# Altium PCB GR_carte_PiHat27.PcbDoc
Units mil, origin at the board's own origin, x right, y up, seen from the top; angles counter-clockwise.
Board outline 1945 x 2315 mil, 2 copper layers (Top Layer, Bottom Layer); 13 components, 19 nets, 92 pads, 0 vias.
Unrouted connection lines stored in the file: 2.
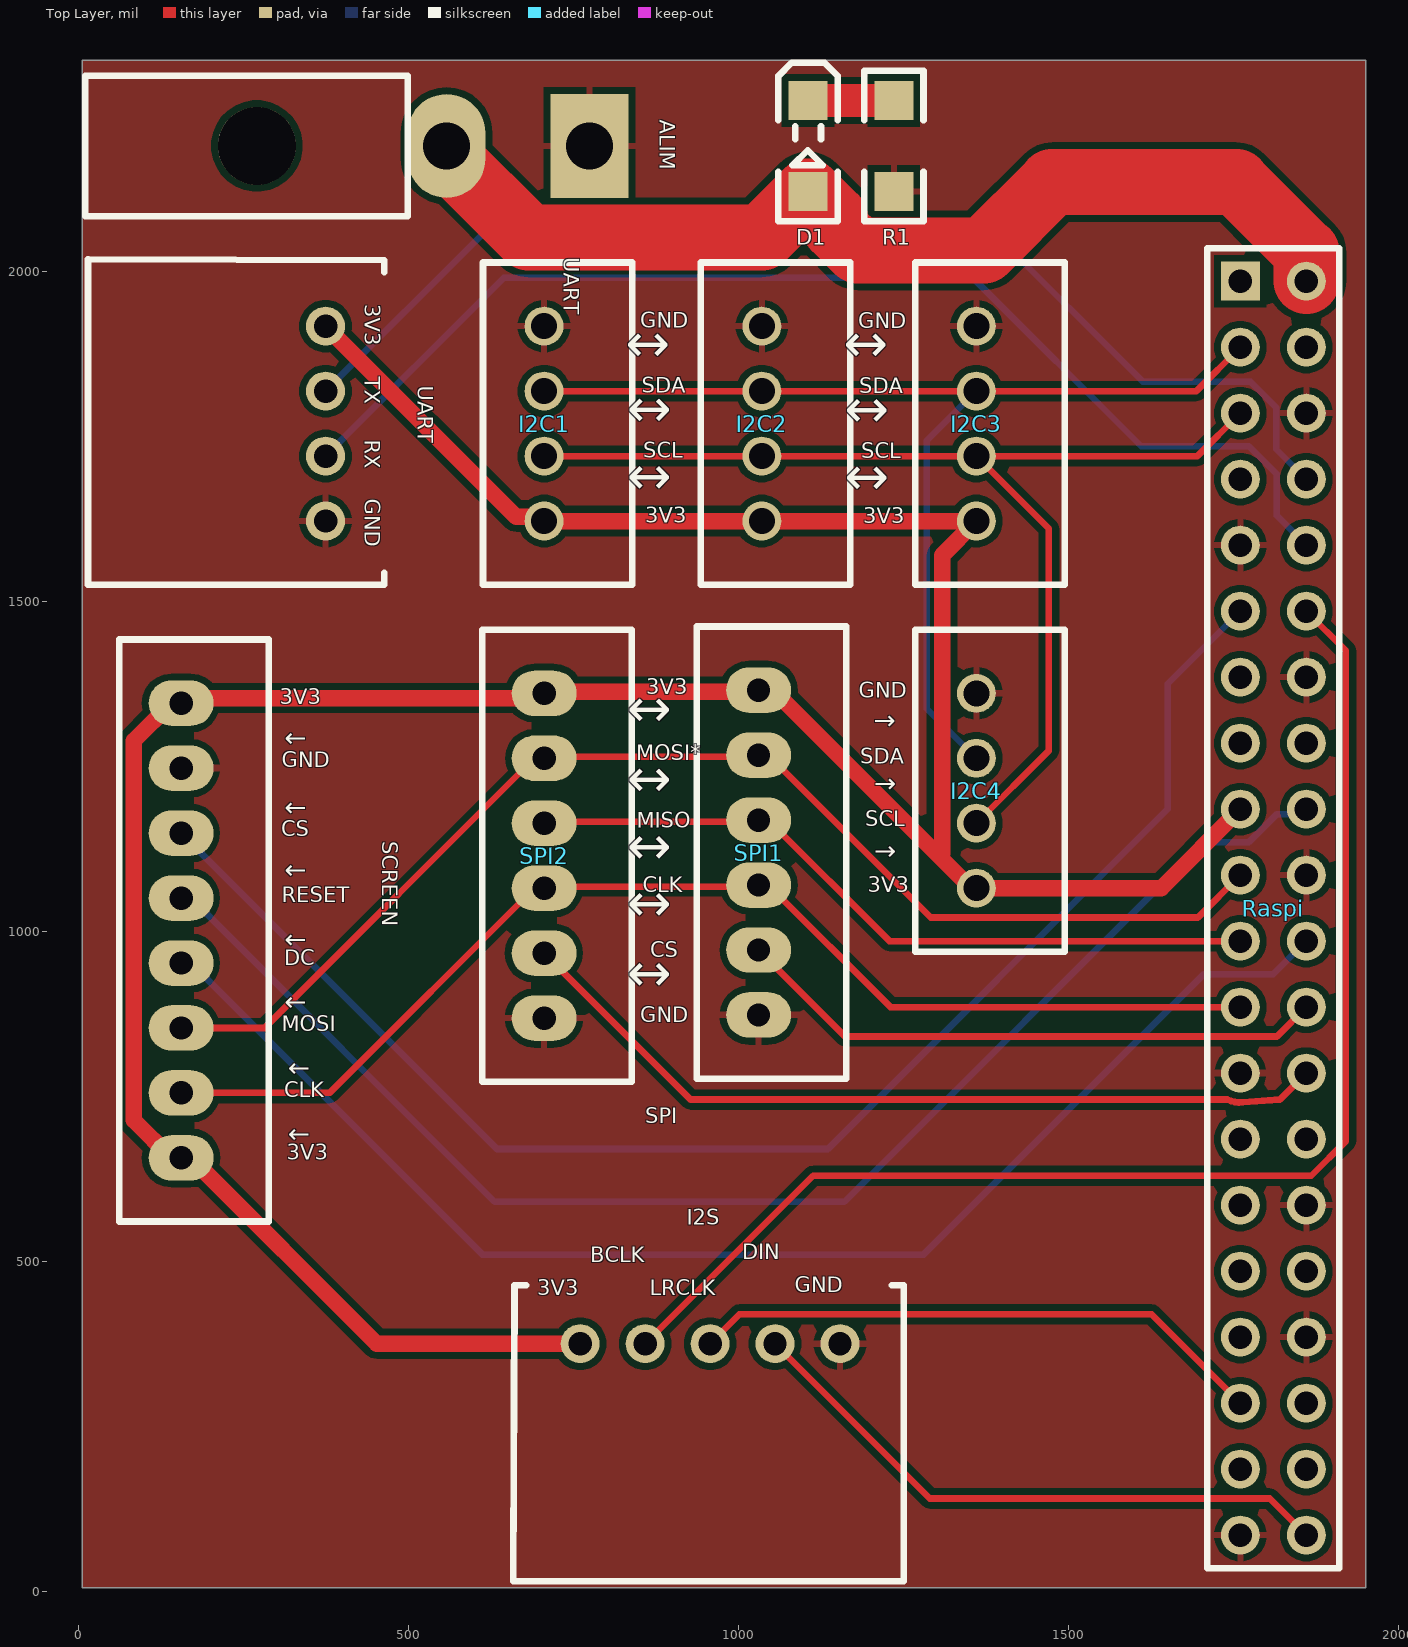
[diagram p0: Top Layer view]
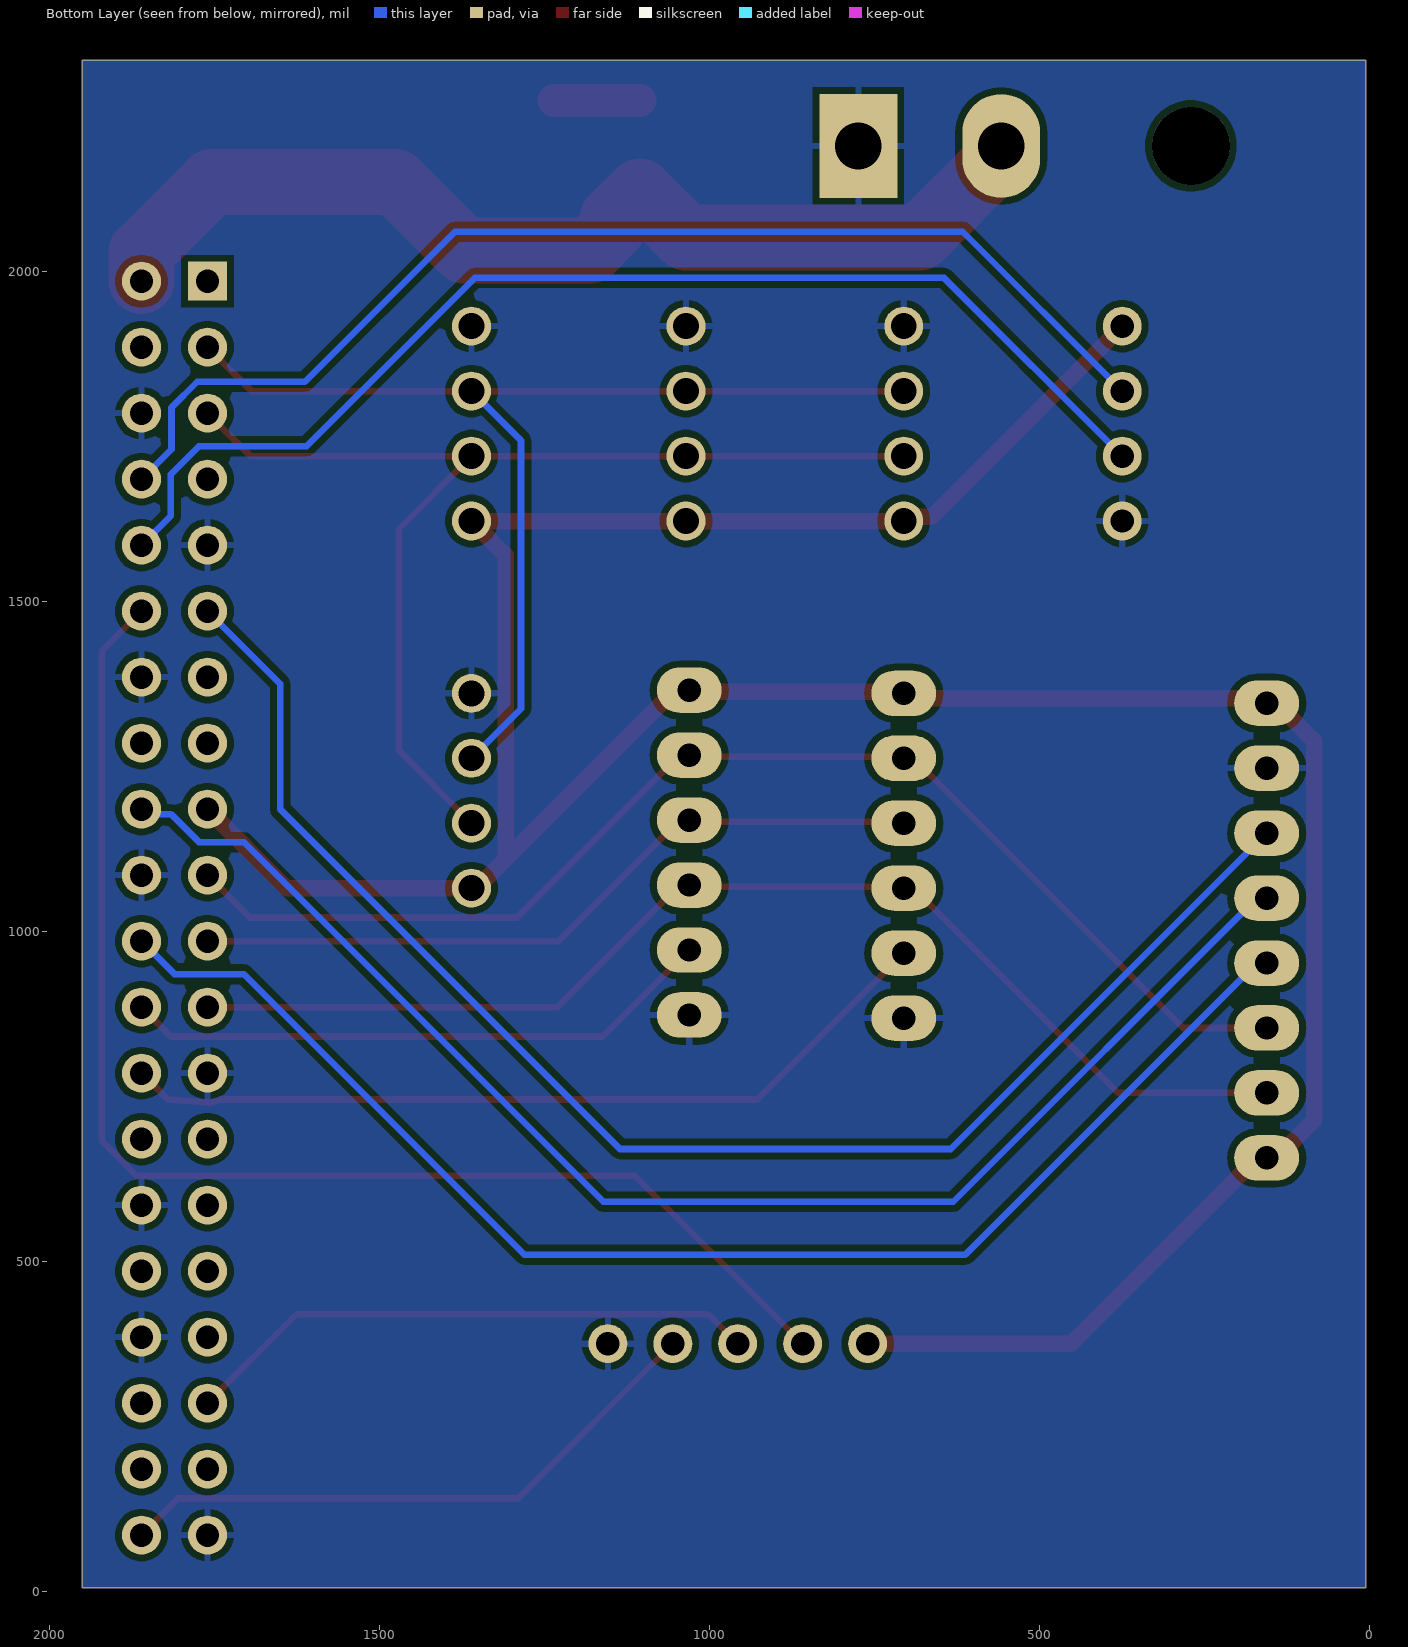
[diagram p1: Bottom Layer view, seen from below]
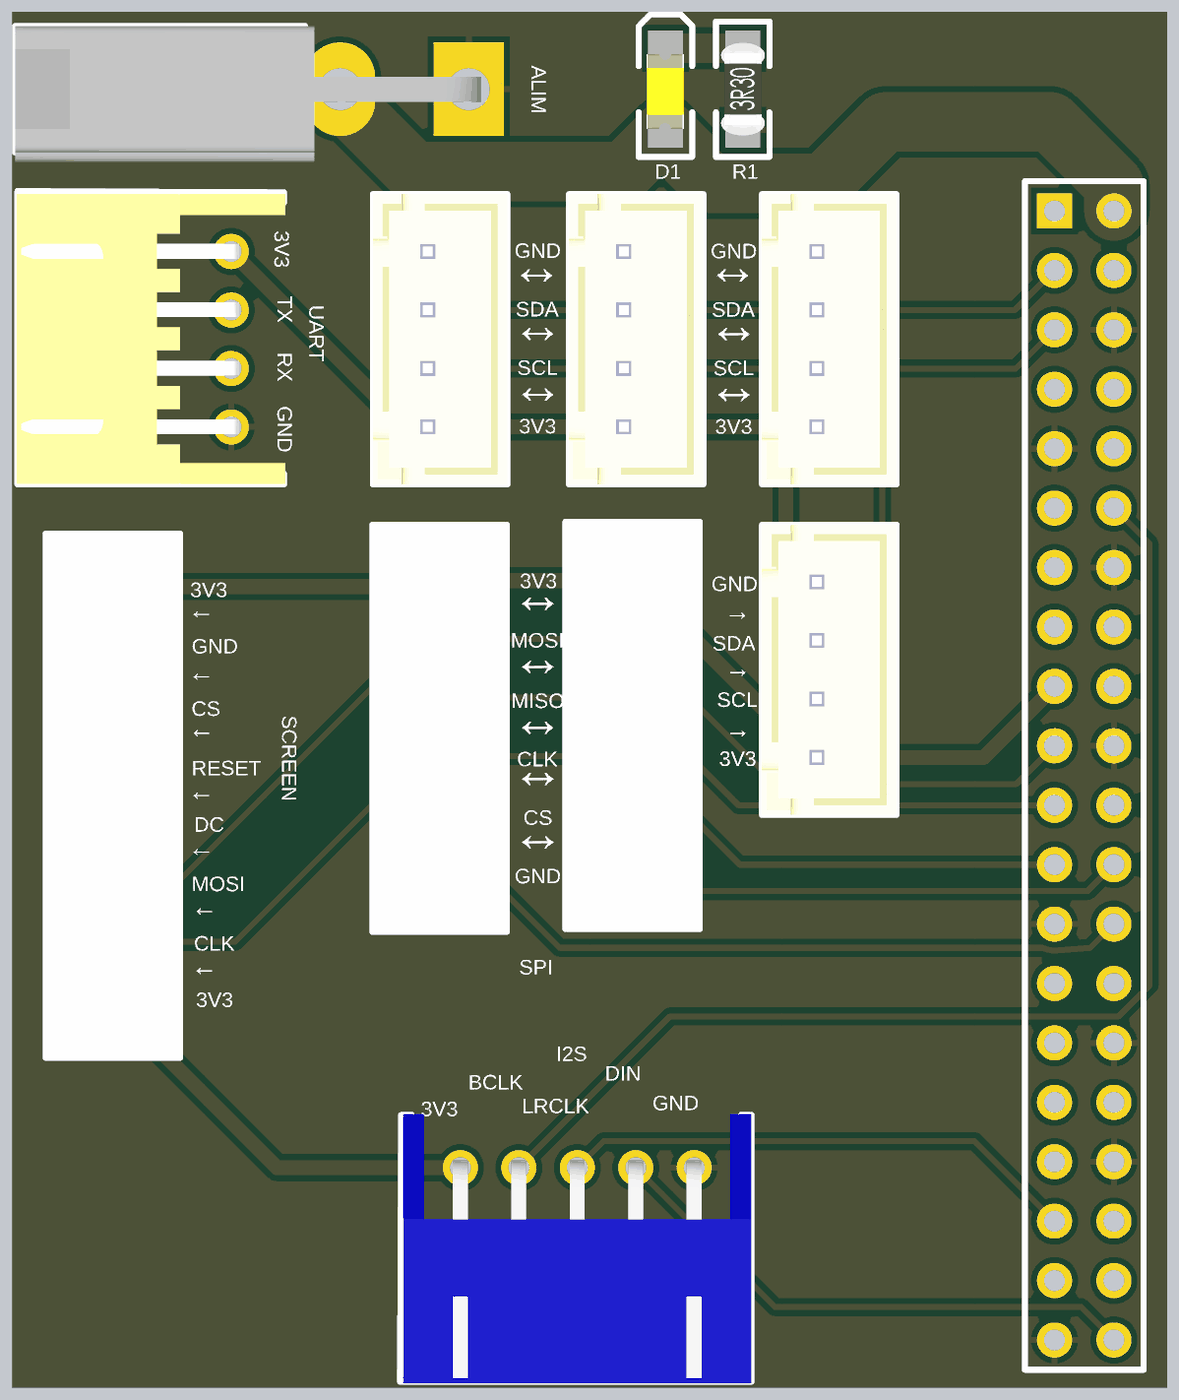
[diagram p2: 3D render of the assembled board from above, using the file's embedded part models]

## Layer stack, top to bottom
Top Solder: solder mask 0.4, Solder Resist, Dk 3.5
Top Layer: signal copper 1.4
Dielectric 1: dielectric 12.6, FR-4, Dk 4.8
Bottom Layer: signal copper 1.4
Bottom Solder: solder mask 0.4, Solder Resist, Dk 3.5

## Board outline
5,5 1950,5 1950,2320 5,2320

## Design rules (kind name [scope] priority, off if disabled: settings)
Clearance [All] p1: gap=10 ignorepadtopadclearanceinfootprint=FALSE
PolygonConnect [All] p1: connectstyle=Relief reliefconductorwidth=10 reliefentries=4 polygonreliefangle="90 Angle" airgapwidth=10
RoutingVias [All] p1: holewidth=28 width=50 viastyle="Through Hole" minholewidth=28 minwidth=50 maxholewidth=28 maxwidth=50
SolderMaskExpansion [All] p1: expansion=0 istentingtop=FALSE
SupplyNets "Schematic Supply Nets" [InNet('GND')] p1: voltage=0.000
SupplyNets "Schematic Supply Nets_2" [InNet('3V3_L')] p2: voltage=0.000
SupplyNets "Schematic Supply Nets_1" [InNet('5V_Pi')] p3: voltage=0.000
Width [All] p1: maxlimit=100 minlimit=10 preferedwidth=10 minimp=50.000000 maximp=50.000000 favimp=50.000000
30 further rules are at their usual default settings.

## Components (designator, comment, footprint, x,y, rotation, side; value= is the part's Value field where it differs from the comment)
ALIM "Header 2H" Molex_MiniFitJr_2x1H 557.24,2190 r180 top
D1 "5V_L" KP-3216SEC 1105,2190 r90 top
I2C1 "Header 4V" B4BXHALFSN 705,1916.85 r270 top
I2C2 "Header 4V" B4BXHALFSN 1035,1916.85 r270 top
I2C3 "Header 4V" B4BXHALFSN 1360,1916.85 r270 top
I2C4 "Header 4V" B4BXHALFSN 1360,1360.55 r270 top
I2S "Header 5H" S5B-XH-A 1153.43,375 r180 top
R1 "Res2" "Resistor 1206" 1235,2190 r90 top value=300
Raspi "Header 20X2" HDR2X20 1760,1985 r270 top
SCREEN "Header 8" "JST XH B8B-XH-A" 155,1001.06 r90 top
SPI1 "Header 6" "JST XH B6B-XH-A" 1030,1119.21 r90 top
SPI2 "Header 6" "JST XH B6B-XH-A" 705,1114.49 r90 top
UART "Header 4H" S4B-XH-A 373.9,1621.57 r90 top

## Footprints (in the part's own frame and the unit in brackets; to place one, negate y for a bottom-side part, rotate by r counter-clockwise, add the part's x,y. Pads: shape width x height; smd on the part's side, far side on the other; paste and mask are expansions set on the pad)
B4BXHALFSN [mm]
  round 1.5 hole 1: 1(0,0) 2(2.5,0) 3(5,0) 4(7.5,0)
  silkscreen extent -2.45,-2.35 9.95,3.4, body extent -2.45,-2.35 9.95,3.4, height 7.52
HDR2X20 [mm] "Connector; Header; 20x2 Position"
  rect 1.5x1.5 hole 0.9: 1(0,0)
  round 1.5 hole 0.9: 2(0,2.54) 3(2.54,0) 4(2.54,2.54) 5(5.08,0) 6(5.08,2.54) 7(7.62,0) 8(7.62,2.54) 9(10.16,0) 10(10.16,2.54) 11(12.7,0) 12(12.7,2.54) 13(15.24,0) 14(15.24,2.54) 15(17.78,0) 16(17.78,2.54) 17(20.32,0) 18(20.32,2.54) 19(22.86,0) 20(22.86,2.54) 21(25.4,0) 22(25.4,2.54) 23(27.94,0) 24(27.94,2.54) 25(30.48,0) 26(30.48,2.54) 27(33.02,0) 28(33.02,2.54) 29(35.56,0) 30(35.56,2.54) 31(38.1,0) 32(38.1,2.54) 33(40.64,0) 34(40.64,2.54) 35(43.18,0) 36(43.18,2.54) 37(45.72,0) 38(45.72,2.54) 39(48.26,0) 40(48.26,2.54)
  silkscreen extent -1.27,-1.27 49.53,3.81
"JST XH B6B-XH-A" [mm]
  oval 1.75x2.5 hole 0.9: 1(-6.25,0) 2(-3.75,0) 3(-1.25,0) 4(1.25,0) 5(3.75,0) 6(6.25,0)
  silkscreen extent -8.7,-3.38 8.7,2.38, body extent -8.7,-3.38 8.7,2.38, height 7
"JST XH B8B-XH-A" [mm]
  oval 1.75x2.5 hole 0.9: 1(-8.75,0) 2(-6.25,0) 3(-3.75,0) 4(-1.25,0) 5(1.25,0) 6(3.75,0) 7(6.25,0) 8(8.75,0)
  silkscreen extent -11.2,-3.38 11.2,2.38, body extent -11.2,-3.38 11.2,2.38, height 7
KP-3216SEC [mm]
  rect 1.5x1.5 smd: 1(-1.75,0) 2(1.75,0)
  silkscreen extent -2.89,-1.14 3.2,1.14, body extent -1.7,-0.79 1.5,0.81, height 1.1
Molex_MiniFitJr_2x1H [mm] "Connecteur Molex 2"
  rect 3x4 hole 1.8: 1(-5.5,0)
  oval 3x4 hole 1.8: 2(0,0)
  round 3 hole 3 unplated: 3(7.3,0)
  silkscreen extent 1.5,-2.7 13.9,2.7, body extent -6.03,-2.7 13.9,3.1, height 11.01
"Resistor 1206" [mm]
  rect 1.5x1.5 smd: 1(-1.75,0) 2(1.75,0)
  silkscreen extent -2.89,-1.14 2.89,1.14, body extent -1.98,-0.95 1.98,0.93, height 0.55
S4B-XH-A [mm]
  round 1.5 hole 0.9: 1(0,0) 2(2.5,0) 3(5,0) 4(7.5,0)
  silkscreen extent -2.45,-2.26 10.08,9.14, body extent -2.44,-2.32 9.96,9.18, height 6.15
S5B-XH-A [mm]
  round 1.5 hole 0.9: 1(0,0) 2(2.5,0) 3(5,0) 4(7.5,0) 5(10,0)
  silkscreen extent -2.45,-2.26 12.58,9.14, body extent -2.45,-2.3 12.45,9.2, height 6.15

## Part data
ALIM: "Header, 2-Pin, Right Angle", LatestRevisionDate=17-Jul-2002, LatestRevisionNote="Re-released for DXP Platform.", Publisher="Altium Limited"
D1: library part LED2, "Typical RED, GREEN, YELLOW, AMBER GaAs LED", LatestRevisionDate=17-Jul-2002, LatestRevisionNote="Re-released for DXP Platform.", PackageDescription="SM LED; 2 Flat Leads", PackageReference=3.2X1.6X1.1, PackageVersion=Feb-2002, Published=8-Jun-2000, Publisher="Altium Limited"
I2C1 I2C2 I2C3 I2C4: library part "Header 4H", "Header, 4-Pin, Right Angle", LatestRevisionDate=17-Jul-2002, LatestRevisionNote="Re-released for DXP Platform.", Publisher="Altium Limited"
I2S: "Header, 5-Pin, Right Angle", LatestRevisionDate=17-Jul-2002, LatestRevisionNote="Re-released for DXP Platform.", Publisher="Altium Limited"
R1: "Resistor", LatestRevisionDate=17-Jul-2002, LatestRevisionNote="Re-released for DXP Platform.", PackageDescription="Axial Device, Thru-Hole; 2 Leads; 0.4 in Pin Spacing", PackageReference=AXIAL-0.4, Published=8-Jun-2000, Publisher="Altium Limited"
Raspi: "Header, 20-Pin, Dual row", LatestRevisionDate=17-Jul-2002, LatestRevisionNote="Re-released for DXP Platform.", Publisher="Altium Limited"
SCREEN: "Header, 8-Pin", LatestRevisionDate=17-Jul-2002, LatestRevisionNote="Re-released for DXP Platform.", Publisher="Altium Limited"
SPI1 SPI2: "Header, 6-Pin", LatestRevisionDate=17-Jul-2002, LatestRevisionNote="Re-released for DXP Platform.", Publisher="Altium Limited"
UART: "Header, 4-Pin, Right Angle", LatestRevisionDate=17-Jul-2002, LatestRevisionNote="Re-released for DXP Platform.", Publisher="Altium Limited"

## Nets (pads, with @x,y where several pads share a name; then routed paths per layer and width w, separated by ;. In a path a pad name is that pad's centre, name@x,y a point inside that pad or via, vN(x,y) a via of type N, cw(c..) or ccw(c..) an arc to the next point about the centre after c; other vN are vias at no path point)
3V3_L: I2C1.4 I2C2.4 I2C3.4 I2C4.4 I2S.5 Raspi.1 Raspi.17 SCREEN.1 SCREEN.8 SPI1.6 SPI2.6 UART.4 | length 4908.3
  Top Layer w25: UART.4 662.66,1628.09 698.48,1628.09 I2C1.4 I2C2.4 I2C3.4 1307.97,1569.55 1307.97,1117.3 ; I2S.5 451.34,375 169.76,656.57 SCREEN.1 140.24,656.57 83.29,713.52 83.29,1288.6 140.24,1345.55 SCREEN.8 162.5,1353.05 697.5,1353.05 SPI2.6 707.36,1362.91 1027.64,1362.91 SPI1.6 1052.38,1365.28 1352.38,1065.28 I2C4.4 1640.28,1065.28 Raspi.17
5V_Pi: ALIM.2 D1.1 Raspi.2 Raspi.4 | length 1573.7
  Top Layer w100: ALIM.2 557.24,2175.22 681.2,2051.26 1035.16,2051.26 D1.1 1145.47,2080.63 1145.47,2066.72 1180.62,2031.57 1371.57,2031.57 1475,2135 1753.91,2135 1860,2028.91 Raspi.2
GND: ALIM.1 I2C1.1 I2C2.1 I2C3.1 I2C4.1 I2S.1 R1.1 Raspi.6 Raspi.9 Raspi.14 Raspi.20 Raspi.25 Raspi.30 Raspi.34 Raspi.39 SCREEN.7 SPI1.1 SPI2.1 UART.1
NetD1_2: D1.2 R1.2 | length 130
  Top Layer w50: D1.2 R1.2
SC_CS: Raspi.11 SCREEN.6 | length 2252.2
  Bottom Layer w10: SCREEN.6 633.7,670 1135,670 1650,1185 1650,1375 Raspi.11
SC_DC: Raspi.22 SCREEN.4 | length 2084.8
  Bottom Layer w10: SCREEN.4 169.76,951.85 611.61,510 1280,510 1705,935 1810,935 Raspi.22
SC_RESET: Raspi.18 SCREEN.5 | length 2142.1
  Bottom Layer w10: SCREEN.5 169.76,1050.28 630.04,590 1160,590 1705,1135 1772.97,1135 1815.47,1177.5 1852.5,1177.5 Raspi.18
SPI0_CS1: Raspi.24 SPI1.2 | length 902.7
  Top Layer w10: SPI1.2 1161.1,840.47 1815.47,840.47 Raspi.24
SPI0_CS2: Raspi.26 SPI2.2 | length 1264.3
  Top Layer w10: SPI2.2 923.92,747.93 926.85,745 1740.44,745 ccw(c1760,785) 1763.45,740.61 1820,745 Raspi.26
SPI0_MISO: Raspi.21 SPI1.4 SPI2.4 | length 1132.9
  Top Layer w10: SPI2.4 707.36,1166.06 1027.64,1166.06 SPI1.4 1044.76,1168.43 1228.19,985 Raspi.21
SPI0_MOSI: Raspi.19 SCREEN.3 SPI1.5 SPI2.5 | length 1904.8
  Top Layer w10: SCREEN.3 281.54,853.43 690.24,1262.13 SPI2.5 707.36,1264.49 1027.64,1264.49 SPI1.5 1044.76,1266.85 1290.87,1020.75 1695.75,1020.75 Raspi.19
SPI0_SCLK: Raspi.23 SCREEN.2 SPI1.3 SPI2.3 | length 1812.1
  Top Layer w10: SCREEN.2 379.96,755 690.24,1065.28 SPI2.3 707.36,1067.64 1027.64,1067.64 SPI1.3 1044.76,1070 1229.76,885 Raspi.23
T_GPIO_18: I2S.4 Raspi.12 | length 2016.9
  Top Layer w10: I2S.4 1112.68,629.53 1867.5,629.53 1920,682.03 1920,1425 Raspi.12
T_GPIO_19: I2S.3 Raspi.35 | length 877.6
  Top Layer w10: I2S.3 1001.1,419.53 1625.47,419.53 Raspi.35
T_GPIO_21: I2S.2 Raspi.40 | length 925.1
  Top Layer w10: I2S.2 1289.53,140.47 1804.53,140.47 Raspi.40
T_I2C_SCL: I2C1.3 I2C2.3 I2C3.3 I2C4.3 Raspi.5 | length 1729.4
  Top Layer w10: I2C1.3 I2C2.3 I2C3.3 ; I2C4.3 1470,1273.7 1470,1610 I2C3.3 ; Raspi.5 1695,1720 I2C3.3
T_I2C_SDA: I2C1.2 I2C2.2 I2C3.2 I2C4.2 Raspi.3 | length 1701
  Top Layer w10: I2C1.2 I2C2.2 I2C3.2 1693.43,1818.43 Raspi.3
  Bottom Layer w10: I2C4.2 1285,1337.13 1285,1743.43 I2C3.2
T_UART_RX: Raspi.10 UART.2 | length 1802.6
  Bottom Layer w10: UART.2 643.9,1990 1355,1990 1610,1735 1772.97,1735 1815.47,1692.5 1815.47,1629.53 Raspi.10
T_UART_TX: Raspi.8 UART.3 | length 1778.4
  Bottom Layer w10: UART.3 615.47,2060 1385,2060 1612.5,1832.5 1775.47,1832.5 1814.53,1793.44 1814.53,1730.47 Raspi.8
pads on no net: ALIM.3 Raspi.7 Raspi.13 Raspi.15 Raspi.16 Raspi.27 Raspi.28 Raspi.29 Raspi.31 Raspi.32 Raspi.33 Raspi.36 Raspi.37 Raspi.38

## Polygon pours and split planes (outlines as drawn)
GND on Top Layer "GND_L01_P002" (solid, remove dead copper, pour order 2): 5,5 1950,5 1950,2320 5,2320
GND on Bottom Layer "GND_L02_P003" (solid, remove dead copper, pour order 3): 5,5 1950,5 1950,2320 5,2320

## Silkscreen, mask and mechanical layers (free items; w line width, h text height)
Top Overlay:
  text "3V3" at 425,1950 h40 r270
  text "GND" at 850.78,1906.14 h40
  text "GND" at 1180.92,1905.52 h40
  text "↕" at 911.42,1854.38 h100 r90
  text "↕" at 1241.42,1854.38 h100 r90
  text "TX" at 425,1840 h40 r270
  text "UART" at 505.43,1826.9 h40 r270
  text "SDA" at 852.67,1807.72 h40
  text "SDA" at 1182.81,1807.09 h40
  text "↕" at 913.35,1756.23 h100 r90
  text "↕" at 1243.49,1755.61 h100 r90
  text "RX" at 425,1745 h40 r270
  text "SCL" at 855.29,1709.29 h40
  text "SCL" at 1185.43,1708.66 h40
  text "GND" at 425,1655 h40 r270
  text "↕" at 913.35,1653.87 h100 r90
  text "↕" at 1243.49,1653.24 h100 r90
  text "3V3" at 858.39,1610.87 h40
  text "3V3" at 1188.52,1610.24 h40
  text "3V3" at 859.76,1350.43 h40
  text "GND" at 1182.15,1345.43 h40
  text "3V3" at 304.76,1335.43 h40
  text "→" at 345.61,1313.41 h50 r180
  text "↕" at 913.49,1301.9 h100 r90
  text "→" at 1204.39,1296.59 h50
  text "MOSI*" at 844.3,1250.43 h40
  text "SDA" at 1184.05,1245.43 h40
  text "GND" at 307.15,1240.43 h40
  text "→" at 345.61,1208.41 h50 r180
  text "→" at 1204.94,1200.8 h50
  text "↕" at 913.49,1195.61 h100 r90
  text "SCL" at 1191.67,1150.43 h40
  text "MISO" at 845.2,1148.66 h40
  text "CS" at 306.97,1135.43 h40
  text "→" at 345.61,1113.41 h50 r180
  text "→" at 1204.94,1098.44 h50
  text "↕" at 913.49,1093.24 h100 r90
  text "CLK" at 854.88,1050.52 h40
  text "3V3" at 1195.31,1051.1 h40
  text "RESET" at 307.17,1035.43 h40
  text "→" at 345.61,1008.41 h50 r180
  text "↕" at 913.49,1006.9 h100 r90
  text "CS" at 865.73,952.09 h40
  text "DC" at 311.24,940.43 h40
  text "→" at 345.61,913.41 h50 r180
  text "↕" at 913.49,900.61 h100 r90
  text "GND" at 850.92,853.66 h40
  text "MOSI" at 307.24,840.43 h40
  text "→" at 350.61,813.41 h50 r180
  text "CLK" at 311.12,740.43 h40
  text "→" at 350.61,713.41 h50 r180
  text "SPI" at 858.61,700.43 h40
  text "3V3" at 314.76,645.43 h40
  text "DIN" at 1005,495 h40
  text "BCLK" at 775,490 h40
  text "GND" at 1085,445 h40
  text "3V3" at 695,440 h40
  text "LRCLK" at 865,440 h40
Mechanical 1:
  lines w10: 5,5 5,2320 15,2320 1950,2320 1950,5 5,5